# Altium PCB PCB1.PcbDoc (part 5 of 5)
Units mm, origin at the board's own origin, x right, y up, seen from the top; angles counter-clockwise.
Board outline 50 x 70 mm, 6 copper layers (Top Layer, L2, L3, L4, L5, Bottom Layer), stack 1.232 mm thick; 119 components, 75 nets, 612 pads, 243 vias.
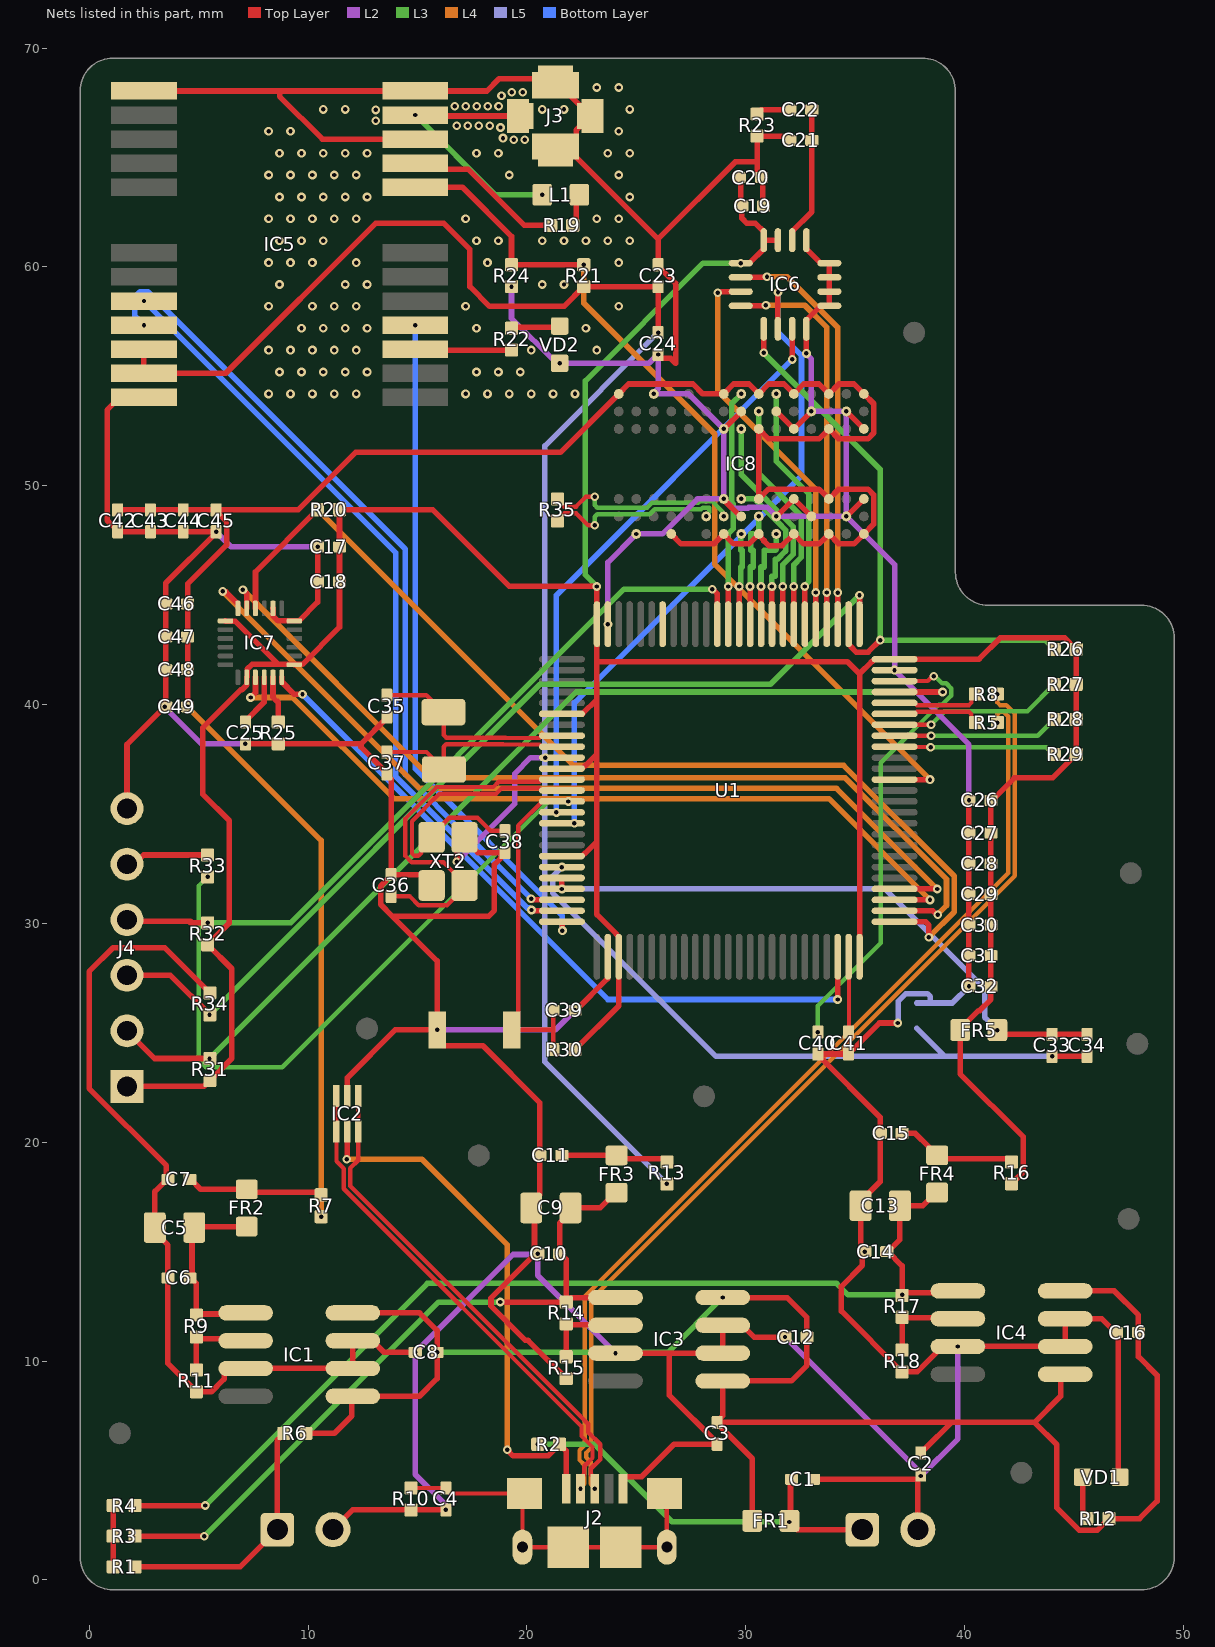
[diagram p6: the nets of this part, all layers, seen from the top]

## Part data (continued)
XT1: library part CRYSTAL_v2, "Crystal, 32.768Khz, 6Pf, 3.2Mm X 1.5Mm Rohs Compliant: Yes", Case/Package=SMD/SMT, ESR (Equivalent Series Resistance)="50 kOhm", Frequency=32.768kHz, Frequency Stability=-, Frequency Tolerance=±20ppm, Load Capacitance=6pF, Manufacturer="Abracon LLC", Manufacturer Part Number=ABS07-LR-32.768KHZ-6-T, Max Operating Temperature=85°C, Min Operating Temperature=-40°C, Operating Mode=Fundamental, Operating Temperature="-40°C ~ 85°C", Package / Case=2-SMD, Supplier Part Number=535-12942-1-ND, Tolerance=0.002%, Category="Crystals and Oscillators", China RoHS=Compliant, ComponentLink1Description=https://datasheet.octopart.com:443/ABS07-LR-32.768KHZ-6-T-Abracon-datasheet-182205061.pdf?src-supplier=Master+Electronics, ComponentLink1URL=https://datasheet.octopart.com:443/ABS07-LR-32.768KHZ-6-T-Abracon-datasheet-182205061.pdf?src-supplier=Master+Electronics, ComponentLink2Description=https://datasheet.octopart.com:443/ABS07-LR-32.768KHZ-6-T-Abracon-datasheet-65748761.pdf?src-supplier=element14+APAC, ComponentLink2URL=https://datasheet.octopart.com:443/ABS07-LR-32.768KHZ-6-T-Abracon-datasheet-65748761.pdf?src-supplier=element14+APAC, ComponentLink3Description=https://datasheet.octopart.com:443/ABS07-LR-32.768KHZ-6-T-Abracon-datasheet-103422647.pdf?src-supplier=Future+Electronics, ComponentLink3URL=https://datasheet.octopart.com:443/ABS07-LR-32.768KHZ-6-T-Abracon-datasheet-103422647.pdf?src-supplier=Future+Electronics, ComponentLink4Description=http://sigma.octopart.com:80/conflict_mineral_statement/Abracon-company-27.pdf?src-supplier=Compliance+Statements, ComponentLink4URL=http://sigma.octopart.com:80/conflict_mineral_statement/Abracon-company-27.pdf?src-supplier=Compliance+Statements, ESR=50kΩ, Harmonized Tariff Schedule (HTS) Code=8541.60.00.10, Height="0.035\" (0.90mm)", Introduction Date=2015-04-02, Length=3.2004mm, Lifecycle Status=Production, Manufacturer Part Number 1=ABS07-LR-32.768KHZ-6-T, Mounting Technology="Surface Mount", Mounting Type="Surface Mount", Packaging="Cut Tape (CT)", Pricing="1=1.5, 10=1.303, 25=1.232, 50=1.1812, 100=1.1322, 250=1.07076, 500=1.02648, 1000=0.98405 (USD)", Ratings=-, REACH SVHC=Yes, RoHS="RoHS Compliant", Schedule B="8541600025, 8541600025|8541600025|8541600025|8541600025|8541600025, 8541600080", Size / Dimension="0.126\" L x 0.061\" W (3.20mm x 1.50mm)", Stock=176427, Supplier=DigiKey, Supplier 1=Digi-Key, Supplier Part Number 1=535-12942-1-ND, Type="kHz Crystal (Tuning Fork)", Width=1.5494mm
XT2: library part CRYSTAL_19M2, "Seam Seal Crystal Ceramic, 8.000Mhz, 18Pf, 20Ppm-20+70C, 50Ppm-20+70C Rohs Compliant: Yes", Case/Package=CSMD, ESR (Equivalent Series Resistance)=200Ω, Frequency Stability=±10ppm, Load Capacitance=10pF, Manufacturer=Abracon, Manufacturer 1="TXC CORPORATION", Manufacturer Part Number=ABM3B-8.000MHZ-B2-T, Manufacturer Part Number 1=7M-27.120MEEQ-T, Max Operating Temperature=70°C, Max Supply Voltage=45V, Min Operating Temperature=-20°C, Min Supply Voltage=8.2V, Operating Mode=Fundamental, Operating Temperature="-20°C ~ 70°C", Output Current=1.8A, Output Voltage=3.3V, Package / Case="2.5mm pitch", Ratings="4.9152 MHz Crystal", Supplier Part Number 1=887-1329-1-ND, Tolerance=0.002%, Category=Crystals, China RoHS=Compliant, ComponentLink1Description=http://www.txccrystal.com/images/pdf/7m-accuracy.pdf, ComponentLink1URL=http://www.txccrystal.com/images/pdf/7m-accuracy.pdf, ComponentLink2Description=https://datasheet.octopart.com:443/ABM3B-8.000MHZ-B2-T-Abracon-datasheet-103053453.pdf?src-supplier=IHS, ComponentLink2URL=https://datasheet.octopart.com:443/ABM3B-8.000MHZ-B2-T-Abracon-datasheet-103053453.pdf?src-supplier=IHS, ComponentLink3Description=https://datasheet.octopart.com:443/ABM3B-8.000MHZ-B2-T-Abracon-datasheet-12510201.pdf?src-supplier=Farnell, ComponentLink3URL=https://datasheet.octopart.com:443/ABM3B-8.000MHZ-B2-T-Abracon-datasheet-12510201.pdf?src-supplier=Farnell, ComponentLink4Description=https://datasheet.octopart.com:443/ABM3B-8.000MHZ-B2-T-Abracon-datasheet-10078707.pdf?src-supplier=Farnell, ComponentLink4URL=https://datasheet.octopart.com:443/ABM3B-8.000MHZ-B2-T-Abracon-datasheet-10078707.pdf?src-supplier=Farnell, ComponentLink5Description=https://datasheet.octopart.com:443/ABM3B-8.000MHZ-B2-T-Abracon-datasheet-8877207.pdf?src-supplier=Farnell, ComponentLink5URL=https://datasheet.octopart.com:443/ABM3B-8.000MHZ-B2-T-Abracon-datasheet-8877207.pdf?src-supplier=Farnell, ComponentLink6Description=https://datasheet.octopart.com:443/ABM3B-8.000MHZ-B2-T-Abracon-datasheet-8791629.pdf?src-supplier=Farnell, ComponentLink6URL=https://datasheet.octopart.com:443/ABM3B-8.000MHZ-B2-T-Abracon-datasheet-8791629.pdf?src-supplier=Farnell, ComponentLink7Description=https://datasheet.octopart.com:443/ABM3B-8.000MHZ-B2-T-Abracon-datasheet-8450969.pdf?src-supplier=Farnell, ComponentLink7URL=https://datasheet.octopart.com:443/ABM3B-8.000MHZ-B2-T-Abracon-datasheet-8450969.pdf?src-supplier=Farnell, ComponentLink8Description=https://datasheet.octopart.com:443/ABM3B-8.000MHZ-B2-T-Abracon-datasheet-5300259.pdf?src-supplier=Farnell, ComponentLink8URL=https://datasheet.octopart.com:443/ABM3B-8.000MHZ-B2-T-Abracon-datasheet-5300259.pdf?src-supplier=Farnell, ComponentLink9Description=https://datasheet.octopart.com:443/ABM3B-8.000MHZ-B2-T-Abracon-datasheet-189095940.pdf?src-supplier=JRH+Electronics, ComponentLink9URL=https://datasheet.octopart.com:443/ABM3B-8.000MHZ-B2-T-Abracon-datasheet-189095940.pdf?src-supplier=JRH+Electronics, ComponentLink10Description=https://datasheet.octopart.com:443/ABM3B-8.000MHZ-B2-T-Abracon-datasheet-28516014.pdf?src-supplier=element14+APAC, ComponentLink10URL=https://datasheet.octopart.com:443/ABM3B-8.000MHZ-B2-T-Abracon-datasheet-28516014.pdf?src-supplier=element14+APAC, ComponentLink11Description=https://datasheet.octopart.com:443/ABM3B-8.000MHZ-B2-T-Abracon-datasheet-128558738.pdf?src-supplier=X-ON, ComponentLink11URL=https://datasheet.octopart.com:443/ABM3B-8.000MHZ-B2-T-Abracon-datasheet-128558738.pdf?src-supplier=X-ON, ComponentLink12Description=https://sigma.octopart.com:443/141159864/technical_drawing/Abracon-ABM3B-8.000MHZ-B2-T.pdf?src-supplier=Abracon+SCT, ComponentLink12URL=https://sigma.octopart.com:443/141159864/technical_drawing/Abracon-ABM3B-8.000MHZ-B2-T.pdf?src-supplier=Abracon+SCT, ComponentLink13Description=https://datasheet.octopart.com:443/ABM3B-8.000MHZ-B2-T-Abracon-datasheet-20679160.pdf?src-supplier=TME, ComponentLink13URL=https://datasheet.octopart.com:443/ABM3B-8.000MHZ-B2-T-Abracon-datasheet-20679160.pdf?src-supplier=TME, ComponentLink14Description=http://sigma.octopart.com:80/conflict_mineral_statement/Abracon-company-27.pdf?src-supplier=Compliance+Statements, ComponentLink14URL=http://sigma.octopart.com:80/conflict_mineral_statement/Abracon-company-27.pdf?src-supplier=Compliance+Statements, Composition=Ceramic, Depth=3.2mm, ESR=200Ω, Frequency=8MHz, Frequency Tolerance=±10ppm, Height=1.1mm, Lead Free="Lead Free", Length=5mm, Lifecycle Status=Production, Material=Ceramic, Mounting Technology="Surface Mount", Mounting Type="Surface Mount", Packaging=Rail/Tube, Pins=4, Pricing="1000=0.2318 (USD)", Radiation Hardening=No, REACH SVHC=Yes, RoHS=Compliant, Schedule B="8541600025, 8541600025|8541600025|8541600025|8541600025|8541600025|8541600025|8541600025|8541600025|8541600025|8541600025|8541600025|8541600025|8541600025|8541600025|8541600025|8541600025|8541600025|8541600025|8541600025|8541600025|8541600025|8541600025|8541600025|85", Size / Dimension="0.126\" L x 0.098\" W (3.20mm x 2.50mm)", Stock=70000, Supplier="Arrow Electronics", Supplier 1=Digi-Key, Supplier Part Number=ABM3B-8.000MHZ-B2-T, Termination=SMD/SMT, Type="MHz Crystal", Weight=120.003531mg, Width=3.2mm

## Via types
v1: diameter 0.4, hole 0.2, Top Layer to Bottom Layer, 129 vias
v2: diameter 0.4, hole 0.2, Top Layer to L3, 51 vias
v3: diameter 0.4, hole 0.2, Top Layer to L2, 31 vias
v4: diameter 0.4, hole 0.2, Top Layer to L4, 24 vias
v5: diameter 0.4, hole 0.2, Top Layer to L5, 8 vias

## Nets (pads, with @x,y where several pads share a name; then routed paths per layer and width w, separated by ;. In a path a pad name is that pad's centre, name@x,y a point inside that pad or via, vN(x,y) a via of type N, cw(c..) or ccw(c..) an arc to the next point about the centre after c; other vN are vias at no path point)
ACCEL1_CS: R28.1 U1.68 | length 7.6
  Top Layer w0.2: U1.68@36.804,38.577 38.473,38.577 v2(38.475,38.575)
  L3 w0.2: v2(38.475,38.575) 43.352,38.575 v2(44.104,39.328)
ACCEL2_CS: R27.1 U1.69 | length 8.1
  Top Layer w0.2: U1.69@36.804,39.077 38.473,39.077 v2(38.475,39.075)
  L3 w0.2: v2(38.475,39.075) 39.1,39.7 42.877,39.7 v2(44.104,40.928)
AVDD: C33.2 C34.2 FR5.1 U1.21 U1.22 | length 28
  Top Layer w0.254: v5(21.604,31.577) U1.21@21.604,32.077 ; v5(41.504,25.128) 41.704,24.928 C33.2@44.004,24.928 C34.2@45.604,24.928
  L5 w0.254: v5(21.604,31.577) 36.359,31.577 40.929,27.007 40.929,25.703 v5(41.504,25.128)
CPU_HSOSC_N: C38.1 U1.13 XT2.1 | length 14.4
  Top Layer w0.2: C38.1@19,34.235 18.345,34.235 17.745,34.835 16.45,34.835 15.65,34.035 XT2.1@15.65,33.935 15.181,33.466 15.181,33.237 15.033,33.088 14.867,33.088 14.75,33.206 14.75,34.671 16.014,35.935 18.6,35.935 18.842,36.177 20.577,36.177 20.677,36.077 U1.13@21.604,36.077
CPU_HSOSC_P: C36.1 U1.12 XT2.3 | length 16.9
  Top Layer w0.2: C36.1@13.8,31.235 14.655,31.235 15.055,30.835 16.35,30.835 17.15,31.635 17.15,31.835 16.196,32.788 14.743,32.788 14.45,33.081 14.45,34.796 15.889,36.235 18.476,36.235 18.718,36.477 20.577,36.477 20.677,36.577 U1.12@21.604,36.577
CPU_LSOSC_N: C37.2 U1.9 XT1.1 | length 9.6
  Top Layer w0.2: C37.2@13.5,37.835 C37.2@13.6,37.835 15.413,37.835 XT1.1@16.212,37.035 16.2,37.047 16.2,38.078 16.317,38.195 18.919,38.195 18.937,38.177 20.577,38.177 20.677,38.077 U1.9@21.604,38.077
CPU_LSOSC_P: C35.2 U1.8 XT1.2 | length 9.5
  Top Layer w0.2: C35.2@13.6,40.435 15.408,40.435 XT1.2@16.188,39.655 ; XT1.2@16.167,39.635 XT1.2@16.188,39.655 ; U1.8@21.604,38.577 20.677,38.577 20.577,38.477 19.061,38.477 19.043,38.495 16.317,38.495 16.2,38.612 16.2,39.642 XT1.2@16.188,39.655
DDR2_1_CLK_N: IC8.K8 R35.2 | length 8.3
  Top Layer w0.2: R35.2@21.4,48.4 21.6,48.6 21.6,48.633 21.717,48.75 22.25,48.75 22.8,48.2 v2(23.1,48.2)
  L3 w0.2: v2(23.1,48.2) 23.1,48.583 23.217,48.7 25.619,48.7 25.844,48.925 27.959,48.925 28.034,49 28.333,49 28.333,48.787 28.2,48.654 v2(28.2,48.6)
DDR2_1_CLK_P: IC8.J8 R35.1 | length 8.9
  Top Layer w0.2: R35.1@21.4,49.4 21.6,49.2 21.6,49.167 21.717,49.05 22.25,49.05 22.7,49.5 v2(23.1,49.5)
  L3 w0.2: v2(23.1,49.5) 23.1,49.117 23.217,49 25.495,49 25.72,49.225 27.835,49.225 27.91,49.3 28.457,49.3 28.962,48.795 28.962,48.638 v2(29,48.6)
DDR2_2_DQ0: IC8.G8 U1.86 | length 5.6
  Top Layer w0.254: U1.86@30.204,43.677 v2@30.204,45.396
  L3 w0.254: v2(30.2,45.4) 30.2,46.289 30.346,46.289 30.346,47.051 30.227,47.051 30.227,47.813 30.6,47.813 v2(30.6,48.6)
DDR2_2_DQ1: IC8.G2 U1.82 | length 10.7
  Top Layer w0.254: v2(32.2,45.4) v2(32.2,45.4) 32.202,43.679 U1.82@32.204,43.677
  L3 w0.254: v2(30.6,53.4) 30.6,50.567 32.535,48.632 32.535,46.728 32.2,46.393 v2(32.2,45.4)
DDR2_2_DQ2: IC8.H7 U1.84 | length 7.3
  Top Layer w0.254: v2(31.2,45.4) 31.202,45.398 31.202,43.679 U1.84@31.204,43.677
  L3 w0.254: v2(29.8,49.4) 30.404,49.4 31.515,48.288 31.827,47.977 31.827,47.022 31.443,46.637 31.346,46.637 31.346,45.875 31.2,45.875 v2(31.2,45.4)
DDR2_2_DQ3: IC8.H3 U1.83 | length 10.1
  Top Layer w0.254: v2(31.7,45.4) v2(31.7,45.4) 31.702,43.679 U1.83@31.704,43.677
  L3 w0.254: v2(29.8,52.6) 29.8,50.505 32.181,48.124 32.181,46.875 31.7,46.394 v2(31.7,45.4)
DDR2_2_DQ4: IC8.H1 U1.88 | length 10.8
  Top Layer w0.254: v2(29.2,45.4) 29.204,45.396 U1.88@29.204,43.677
  L3 w0.254: v2(29.2,45.4) 29.2,47.804 29.427,48.031 29.427,49.169 29.373,49.223 29.373,53.773 v2(29.8,54.2)
DDR2_2_DQ5: IC8.H9 U1.87 | length 4.3
  Top Layer w0.254: v2(29.7,45.4) 29.704,45.396 U1.87@29.704,43.677
  L3 w0.254: v2(29.7,45.4) 29.7,45.44 29.773,45.513 29.773,46.289 29.846,46.289 29.846,47.051 29.773,47.051 29.773,47.773 v2(29.8,47.8)
DDR2_2_DQ6: IC8.F1 U1.81 | length 11.2
  Top Layer w0.254: v2(32.7,45.4) 32.704,45.396 U1.81@32.704,43.677
  L3 w0.254: v2(31.4,54.2) 31.4,51.116 32.889,49.627 32.889,45.629 32.7,45.44 v2(32.7,45.4)
DDR2_2_DQ7: IC8.F9 U1.85 | length 4.8
  Top Layer w0.254: v2(30.7,45.4) 30.702,45.398 30.702,43.679 U1.85@30.704,43.677
  L3 w0.254: v2(30.7,45.4) 30.7,46.289 30.846,46.289 30.846,47.051 31.356,47.051 31.4,47.095 v2(31.4,47.8)
EXTINT: IC5.4 U1.25 | length 30.9
  Top Layer w0.254: U1.25@21.604,30.077 21.625,30.056 v1(21.625,29.675)
  Bottom Layer w0.254: v1(14.904,57.342) 14.904,37.071 21.625,30.35 v1(21.625,29.675)
GND: BATT1.2 C1.1 C2.1 C3.1 C4.1 C5.1 C6.1 C7.2 C8.1 C9.1 C10.1 C11.1 C12.1 C13.1 C14.1 C15.1 C16.1 C17.1 C18.1 C19.1 C20.1 C21.1 C23.1 C24.1 C25.1 C26.1 C27.1 C28.1 C29.1 C30.1 C31.1 C32.1 C35.1 C36.2 C37.1 C38.2 C39.1 C40.1 C41.1 C42.1 C43.1 C44.1 C45.1 C46.1 C47.1 C48.1 C49.1 IC1.3 IC1.6 IC1.7 IC2.2 IC3.3 IC3.6 IC3.7 IC4.3 IC4.6 IC4.7 IC5.10 IC5.12 IC5.13 IC5.24 IC6.8 IC6.9 IC6.10 IC6.11 IC6.12 IC6.13 IC7.18 IC7.20 IC8.A3 IC8.A7 IC8.B2 IC8.B8 IC8.D2 IC8.D8 IC8.E3 IC8.E7 IC8.F2 IC8.F8 IC8.H2 IC8.H8 IC8.J3 IC8.J7 IC8.N1 IC8.P9 J1.2 J2.5 J3.2 J4.6 NT1.2 R10.1 R11.1 R15.1 R18.1 R23.2 R24.1 R25.1 R34.1 SB1.1 U1.10 U1.27 U1.74 U1.99 VD1.K VD2.K XT2.2 XT2.4 | length 411.9
  Top Layer w0.254: J4.6@1.729,35.251 1.729,38.179 v3(3.45,39.9) ; IC5.24@2.504,54.042 1.404,54.042 0.823,53.461 0.823,48.427 1.3,47.95 C42.1@1.3,47.9 C43.1@2.8,47.9 C44.1@4.3,47.9 v3(5.8,47.9) 5.8,47.85 3.5,45.55 C46.1@3.5,44.6 C47.1@3.5,43.1 C48.1@3.5,41.6 C49.1@3.5,39.9 ; IC5.13@2.504,68.042 8.704,68.042 ; R34.1@5.515,26.829 3.444,28.9 1.1,28.9 0,27.8 0,22.459 3.528,18.931 3.528,18.372 C7.2@3.6,18.3 3.55,18.3 3,17.75 C5.1@3,16.1 3,15.9 3.6,15.3 C6.1@3.6,13.8 3.6,9.9 R11.1@4.9,8.6 5.581,8.6 6.165,9.184 6.165,9.459 6.371,9.665 IC1.3@7.15,9.665 IC1.6@12.05,9.665 IC1.7@12.05,10.935 12.95,10.935 13.485,10.4 v3(14.9,10.4) ; v3(7.14,38.208) R25.1@8.64,38.208 12.423,38.208 ; IC7.20@8.4,44.4 8.417,44.383 8.417,44.034 8.628,43.823 IC7.18@9.375,43.825 IC7.18@9.375,43.825 9.581,43.825 10.44,44.684 C18.1@10.44,45.608 10.44,47.14 C17.1@10.5,47.2 ; BATT1.2@11.14,2.3 12.04,3.2 R10.1@14.7,3.2 v3(16.3,3.2) ; IC2.2@11.8,22.113 11.8,22.95 13.985,25.135 v3(15.9,25.135) ; C35.1@13.6,39.435 13.6,39.385 12.423,38.208 ; IC5.10@14.904,65.842 10.658,65.842 8.704,67.796 8.704,68.042 ; XT2.2@15.65,31.735 15.65,31.764 15.179,32.235 C36.2@13.8,32.235 ; v3(16.8,32.825) 16.814,32.839 16.814,33.511 XT2.4@17.15,33.847 ; XT2.4@17.15,33.935 XT2.4@17.15,33.847 ; J3.2@21.3,65.5 J3.2@21.775,65.5 ; J3.2@21.3,68.6 18.731,68.6 18.173,68.042 IC5.12@14.904,68.042 8.704,68.042 ; R15.1@21.8,9.2 20.052,10.948 19.937,10.948 18.362,12.523 18.362,12.877 20.263,14.777 20.377,14.777 v3(20.5,14.9) 20.473,14.9 20.35,15.023 20.35,16.85 C9.1@20.2,17 20.2,17.2 20.6,17.6 C11.1@20.6,19.4 20.6,21.8 17.988,24.412 16.173,24.412 15.9,24.685 v3(15.9,25.135) ; J3.2@21.973,68.127 21.973,67.827 J3.2@22.9,66.9 22.248,66.248 22.248,65.973 J3.2@21.775,65.5 ; C39.1@22.25,26.035 23.695,27.48 23.695,28.468 U1.27@23.704,28.477 ; v3(24.05,10.365) 26.5,10.365 ; J2.5@24.4,4.175 24.4,4.65 24.473,4.723 25.252,4.723 26.729,6.2 C3.1@28.7,6.2 28.7,6.25 26.5,8.45 26.5,10.365 ; C24.1@26,55.95 26.123,55.827 26.573,55.827 26.8,55.6 26.8,59.25 26,60.05 C23.1@26,60.1 26,61.275 ; v3(29,49.4) 29,49.362 29.762,48.6 IC8.H8@29.8,48.6 ; v3(29,52.6) IC8.H2@29.8,53.4 ; C19.1@30.821,62.783 30.771,62.833 30.771,64.033 C20.1@30.721,64.083 30.671,64.083 30.521,64.233 30.521,64.8 ; v3(31.4,48.6) IC8.E7@32.2,49.4 IC8.D8@33,48.6 ; IC8.F2@31.4,53.4 IC8.E3@32.2,52.6 v3(33,53.4) ; v3(31.8,11.1) 30.385,11.1 29.85,11.635 IC3.7@28.95,11.635 IC3.6@28.95,10.365 26.5,10.365 ; C21.1@32.021,65.783 31.971,65.783 31.771,65.983 R23.2@30.521,65.983 30.521,64.8 ; v3(32.775,56.05) IC6.8@32.775,57.175 32.775,57.575 33.425,58.225 IC6.9@33.825,58.225 IC6.10@33.825,58.875 IC6.11@33.825,59.525 IC6.12@33.825,60.175 33.425,60.175 32.775,60.825 IC6.13@32.775,61.225 ; C1.1@33.1,4.6 37.85,4.6 37.87,4.62 J1.2@37.87,2.3 ; v3(34.6,48.6) IC8.A7@35.4,49.4 ; v3(34.6,53.4) IC8.A3@35.4,52.6 ; v5(36.95,25.45) 36.115,25.45 34.873,24.208 34.823,24.208 34.7,24.085 C41.1@34.7,24.035 33.35,24.035 33.3,23.985 36.15,21.135 C15.1@36.15,20.405 36.15,18.205 35.25,17.305 C13.1@35.25,17.105 35.25,15.155 35.4,15.005 v3(35.45,15.005) 35.329,14.884 35.329,14.374 34.373,13.418 34.373,12.282 R18.1@37.15,9.505 37.831,9.505 38.715,10.389 38.715,10.464 38.921,10.67 IC4.3@39.31,10.67 ; v3(39.7,10.67) IC4.6@44.6,10.67 IC4.7@44.6,11.94 46.265,11.94 46.9,11.305 C16.1@46.95,11.305 47.025,11.23 47.025,4.775 VD1.K@47.1,4.7 ; v5(40.204,27.128) C31.1@40.204,28.528 C30.1@40.204,29.928 C29.1@40.204,31.328 C28.1@40.204,32.728 C27.1@40.204,34.128 v3(40.204,35.628) ; 12.423,38.208 12.423,38.062 13.6,36.885 C37.1@13.6,36.835 13.6,36.785 13.8,36.585 C36.2@13.8,32.235 ; C36.2@13.8,32.235 13.8,32.185 13.323,31.708 13.323,30.87 13.866,30.327 ; 13.866,30.327 18.251,30.327 18.518,30.594 18.518,32.703 19,33.185 C38.2@19,33.235 17.762,33.235 XT2.4@17.15,33.847 ; 13.866,30.327 15.9,28.293 v3(15.9,25.135) ; J3.2@21.775,65.5 26,61.275 ; 26,61.275 29.525,64.8 30.521,64.8
  L2 w0.254: v3(3.45,39.9) 5.142,38.208 v3(7.14,38.208) ; v3(5.8,47.9) 6.492,47.208 v3(10.44,47.208) ; v3(15.9,25.135) 21.3,25.135 v3(22.2,26.035) ; v3(16.3,3.2) 16.275,3.225 16.275,3.45 14.9,4.825 v3(14.9,10.4) 19.372,14.872 20.472,14.872 v3(20.5,14.9) 20.5,13.915 v3(24.05,10.365) ; v3(16.8,32.825) 19.45,35.475 19.45,36.85 20.175,37.575 v3(20.85,37.575) ; v3(19.3,59.1) 19.3,57.65 21.325,55.625 21.475,55.625 v3(21.5,55.6) 25.578,55.6 25.978,56 v3(26,56) 26,54.439 25.8,54.24 v3(25.8,54.2) 27.4,54.2 v3(29,52.6) v3(29,49.4) ; v3(23.704,43.677) 23.704,46.504 v3(25,47.8) 26.2,47.8 27.8,49.4 v3(29,49.4) ; v3(31.8,11.1) 37.972,4.928 37.972,4.778 v3(38,4.75) 39.7,6.45 v3(39.7,10.67) ; v3(32.775,56.05) 32.775,56.01 33,55.785 v3(33,53.4) v3(34.6,53.4) v3(34.6,48.6) ; v3(40.204,35.628) 40.204,38.177 v3(36.804,41.577) 36.804,46.396 v3(34.6,48.6) ; v3(29,49.4) 29.427,48.973 30.095,48.973 30.149,49.027 30.973,49.027 v3(31.4,48.6) v3(34.6,48.6)
  L5 w0.254: v5(36.95,25.45) 36.978,25.478 36.978,26.45 37.319,26.791 38.307,26.791 38.44,26.658 38.44,26.364 ; NT1.2@37.813,26.364 38.44,26.364 ; v5(40.204,27.128) 39.441,26.364 38.44,26.364
  other v1: 8.2,54.2 9.2,54.2 10.2,54.2 11.2,54.2 12.2,54.2 17.2,54.2 18.2,54.2 19.2,54.2 20.2,54.2 21.2,54.2 22.2,54.2 8.7,55.2 9.7,55.2 10.7,55.2 11.7,55.2 12.7,55.2 17.7,55.2 18.7,55.2 19.7,55.2 8.2,56.2 9.2,56.2 10.2,56.2 11.2,56.2 12.2,56.2 20.2,56.2 23.2,56.2 9.7,57.2 10.7,57.2 11.7,57.2 12.7,57.2 17.7,57.2 22.7,57.2 8.2,58.2 10.2,58.2 11.2,58.2 12.2,58.2 17.2,58.2 24.2,58.2 8.7,59.2 11.7,59.2 12.7,59.2 20.7,59.2 21.7,59.2 8.2,60.2 9.2,60.2 10.2,60.2 12.2,60.2 18.2,60.2 24.2,60.2 8.7,61.2 9.7,61.2 10.7,61.2 17.7,61.2 18.7,61.2 20.7,61.2 21.7,61.2 22.7,61.2 23.7,61.2 24.7,61.2 8.2,62.2 9.2,62.2 10.2,62.2 11.2,62.2 12.2,62.2 17.2,62.2 23.2,62.2 24.2,62.2 8.7,63.2 9.7,63.2 10.7,63.2 11.7,63.2 12.7,63.2 24.7,63.2 8.2,64.2 9.2,64.2 10.2,64.2 11.2,64.2 12.2,64.2 19.2,64.2 24.2,64.2 8.7,65.2 9.7,65.2 10.7,65.2 11.7,65.2 12.7,65.2 17.7,65.2 18.7,65.2 23.7,65.2 24.7,65.2 19.407,65.819 19.907,65.819 18.912,65.89 8.2,66.2 9.2,66.2 24.2,66.2 18.794,66.376 16.801,66.457 17.301,66.457 17.801,66.457 18.301,66.457 13.098,66.677 13.098,67.177 10.7,67.2 11.7,67.2 20.7,67.2 21.7,67.2 24.7,67.2 16.709,67.345 17.209,67.343 17.709,67.343 18.209,67.343 18.709,67.343 18.84,67.826 19.315,67.981 19.815,67.981 23.2,68.2 24.2,68.2
GNDA: C33.1 C34.1 NT1.1 U1.20 | length 30.7
  Top Layer w0.254: v5(44.004,23.928) C34.1@45.604,23.928
  L5 w0.254: v5(21.604,32.577) 21.177,32.15 21.177,31.4 28.65,23.928 39.099,23.928 ; NT1.1@37.813,25.214 39.099,23.928 ; v5(44.004,23.928) 39.099,23.928
GYRO_CS: IC6.5 R26.1 U1.77 | length 27.3
  Top Layer w0.254: v2(30.825,56.075) IC6.5@30.825,57.175 ; U1.77@34.704,43.677 34.704,42.765 34.827,42.642 34.827,42.621 35.048,42.4 35.6,42.4 v2(36.15,42.95)
  L3 w0.254: v2(30.825,56.075) 36.15,50.75 v2(36.15,42.95) 43.682,42.95 v2(44.104,42.528)
GYRO_INT1: IC6.7 U1.15 | length 26.6
  Top Layer w0.254: v1(32.125,55.775) IC6.7@32.125,57.175
  Bottom Layer w0.254: v1(21.35,35.075) 21.35,45 v1(32.125,55.775)
GYRO_INT2: IC6.6 U1.16 | length 30.7
  Top Layer w0.254: IC6.6@31.475,57.175 v1(31.475,58.85)
  Bottom Layer w0.254: v1(22.175,34.575) 22.175,40.082 32.552,50.459 32.552,55.952 31.475,57.029 v1(31.475,58.85)
GYRO_SPI_MISO: IC6.4 U1.79 | length 17.9
  Top Layer w0.254: IC6.4@29.775,58.225 29.784,58.234 30.909,58.234 v4(30.925,58.25) ; v4(33.7,45.125) 33.704,45.121 U1.79@33.704,43.677
  L4 w0.254: v4(30.925,58.25) 32.7,58.25 33.7,57.25 v4(33.7,45.125)
GYRO_SPI_MOSI: IC6.3 U1.80 | length 18.1
  Top Layer w0.254: v4(28.725,58.825) 28.765,58.825 28.815,58.875 IC6.3@29.775,58.875 ; v4(33.2,45.125) 33.2,43.681 U1.80@33.204,43.677
  L4 w0.254: v4(28.725,58.825) 28.725,54.332 33.2,49.857 v4(33.2,45.125)
GYRO_SPI_SPC: IC6.2 U1.78 | length 19
  Top Layer w0.254: IC6.2@29.775,59.525 29.784,59.534 30.959,59.534 v4(30.975,59.55) ; U1.78@34.204,43.677 v4(34.204,45.121)
  L4 w0.254: v4(30.975,59.55) 31.901,59.55 34.204,57.247 v4(34.204,45.121)
MCU_BOOT0: U1.94
MCU_RST: C39.2 R30.1 R33.1 SB1.2 U1.14 | length 46.2
  Top Layer w0.2: R30.1@21.2,24.235 21.2,25.135 ; C39.2@21.2,26.035 21.2,25.135 ; U1.14@21.604,35.577 20.704,35.577 19.6,34.473 19.6,25.435 SB1.2@19.3,25.135 21.2,25.135
  L3 w0.2: v2(5.415,32.129) 5.015,31.729 5.015,23.745 5.334,23.425 8.825,23.425 21,35.6 21.875,35.6 v2(21.9,35.575)
MPU_CS: IC7.22 R20.1 U1.51 | length 47.2
  Top Layer w0.254: IC7.22@7.6,44.4 7.6,46.068 v4(10.44,48.908) ; U1.51@36.804,30.077 38.226,30.077 38.375,29.928 v4(38.375,29.375)
  L4 w0.254: v4(10.44,48.908) 22.123,37.225 34.476,37.225 39.531,32.17 39.531,31.898 39.531,30.531 v4(38.375,29.375)
MPU_FSYNC: IC7.11 R25.2 | length 2.1
  Top Layer w0.254: IC7.11@8.4,41.25 8.4,40.333 8.64,40.092 R25.2@8.64,39.208
MPU_INT: IC7.12 U1.48 | length 33.6
  Top Layer w0.254: IC7.12@8.8,41.25 8.8,41.044 9.369,40.475 v1(9.75,40.475) ; v1(34.2,26.525) 34.204,26.529 U1.48@34.204,28.477
  Bottom Layer w0.254: v1(9.75,40.475) 23.7,26.525 v1(34.2,26.525)
MPU_MISO: IC7.9 U1.53 | length 37.5
  Top Layer w0.254: v4(7.375,40.325) 7.6,40.55 IC7.9@7.6,41.25 ; U1.53@36.804,31.077 v4(38.423,31.077)
  L4 w0.254: v4(7.375,40.325) 9.296,40.325 13.92,35.701 33.799,35.701 v4(38.423,31.077)
MPU_MOSI: IC7.24 U1.54 | length 41.1
  Top Layer w0.254: v4(6.1,45.175) 6.128,45.147 6.259,45.147 IC7.24@6.783,44.623 ; U1.54@36.804,31.577 38.748,31.577 v4(38.75,31.575)
  L4 w0.254: v4(6.1,45.175) 15.1,36.175 34.15,36.175 v4(38.75,31.575)
MPU_REG: C25.2 IC7.10 | length 2.4
  Top Layer w0.254: C25.2@7.14,39.208 7.14,39.258 8,40.118 IC7.10@8,41.25
MPU_SPC: IC7.23 U1.52 | length 42.4
  Top Layer w0.254: v4(7.025,45.25) 7.2,45.075 IC7.23@7.2,44.4 ; U1.52@36.804,30.577 38.559,30.577 38.735,30.4 v4(38.775,30.4)
  L4 w0.254: v4(7.025,45.25) 15.625,36.65 34.55,36.65 39.177,32.023 39.177,30.82 38.775,30.418 v4(38.775,30.4)
NetC1_2: C1.2 FR1.1 J1.1 R2.2 | length 18.4
  Top Layer w0.254: v2(32,2.65) 32.22,2.43 32.35,2.3 J1.1@35.33,2.3 ; FR1.1@32,2.7 32.05,2.75 32.05,4.55 C1.2@32.1,4.6
  L3 w0.254: v2(20.5,6.2) 23.096,6.2 26.646,2.65 v2(32,2.65)
NetC4_2: C4.2 J2.6 R10.2 | length 16.9
  Top Layer w0.2: R10.2@14.7,4.2 C4.2@16.3,4.2 ; C4.2@16.3,4.15 16.5,3.95 J2.6@19.9,3.95 19.8,3.85 J2.6@19.8,1.5 J2.6@21.9,1.5 J2.6@24.3,1.5 J2.6@26.4,1.5 26.4,3.85 J2.6@26.3,3.95
NetC5_2: C5.2 C6.2 FR2.1 IC1.1 R9.2 | length 8.9
  Top Layer w0.254: C6.2@4.6,13.8 4.7,13.9 4.7,16 C5.2@4.8,16.1 4.85,16.15 FR2.1@7.2,16.15 ; C6.2@4.65,13.8 4.9,13.55 R9.2@4.9,12.1 4.952,12.153 7.098,12.153 IC1.1@7.15,12.205
NetC7_1: C7.1 FR2.2 R7.1 | length 6.3
  Top Layer w0.254: C7.1@4.6,18.3 4.65,18.3 5.1,17.85 FR2.2@7.2,17.85 7.325,17.725 10.475,17.725 R7.1@10.6,17.6
NetC9_2: C9.2 C10.2 FR3.1 IC3.1 R3.1 R14.2 | length 33.5
  Top Layer w0.254: R3.1@2.1,2 v2(5.262,2) ; v2(18.789,12.7) R14.2@21.8,12.7 ; C10.2@21.5,14.9 21.5,16.3 22,16.8 C9.2@22,17 23.35,17 24.05,17.7 FR3.1@24.1,17.7 ; C10.2@21.55,14.9 21.8,14.65 R14.2@21.8,12.7 ; IC3.1@24.05,12.905 22.005,12.905 R14.2@21.8,12.7
  L3 w0.254: v2(5.262,2) 15.962,12.7 v2(18.789,12.7)
NetC11_2: C11.2 FR3.2 R13.1 | length 4.9
  Top Layer w0.254: C11.2@21.6,19.4 FR3.2@24.1,19.4 24.25,19.25 26.25,19.25 R13.1@26.4,19.1
NetC13_2: C13.2 C14.2 FR4.1 IC4.1 R4.1 R17.2 | length 48.6
  Top Layer w0.254: R4.1@2.1,3.4 v2(5.306,3.4) ; C14.2@36.45,15.005 C14.2@36.5,15.005 ; v2(37.15,13.025) R17.2@37.15,13.005 37.27,13.125 39.615,13.125 IC4.1@39.7,13.21 ; R17.2@37.15,13.125 37.15,14.355 C14.2@36.5,15.005 ; FR4.1@38.75,17.705 38.7,17.705 38.1,17.105 C13.2@37.05,17.105 37.05,15.555 C14.2@36.5,15.005
  L3 w0.254: v2(5.306,3.4) 15.456,13.55 34.152,13.55 34.677,13.025 v2(37.15,13.025)
NetC15_2: C15.2 FR4.2 R16.1 | length 5.6
  Top Layer w0.254: C15.2@37.15,20.405 37.75,20.405 38.377,19.778 38.377,19.728 38.85,19.255 42,19.255 R16.1@42.15,19.105
NetC21_2: C21.2 C22.2 IC6.14 | length 6.3
  Top Layer w0.254: IC6.14@32.125,61.225 32.125,61.625 33.021,62.521 C21.2@33.021,65.783 C22.2@33.021,67.183
NetC22_1: C22.1 R23.1 | length 1.6
  Top Layer w0.254: R23.1@30.521,66.983 30.721,67.183 C22.1@32.021,67.183
NetC40_2: C40.2 U1.73 | length 21.2
  Top Layer w0.2: U1.73@36.804,41.077 38.323,41.077 38.546,41.3 v2(38.6,41.3)
  L3 w0.2: v2(33.3,25.035) 33.3,26.235 36.175,29.11 36.175,37.34 38.834,40 38.989,40 39.4,40.411 39.4,40.743 39.164,40.979 38.975,40.979 38.654,41.3 v2(38.6,41.3)
NetC41_2: C41.2 U1.49 | length 3.5
  Top Layer w0.2: U1.49@34.704,28.477 34.723,28.458 34.723,25.112 C41.2@34.8,25.035
NetIC1_2: IC1.2 R9.1 R11.2 | length 3.8
  Top Layer w0.254: R11.2@4.9,9.6 R9.1@4.9,11.1 4.982,11.017 7.067,11.017 IC1.2@7.15,10.935
NetIC2_5: IC2.5 J2.1 R2.1 | length 24.5
  Top Layer w0.254: v4(11.775,19.225) 11.788,19.238 11.788,20.475 IC2.5@11.8,20.488 ; v4(19.1,5.95) 19.377,5.673 20.973,5.673 R2.1@21.5,6.2 21.8,5.9 J2.1@21.8,4.175
  L4 w0.254: v4(11.775,19.225) 15.2,19.225 19.1,15.325 v4(19.1,5.95)
NetIC3_2: IC3.2 R14.1 R15.2 | length 3.7
  Top Layer w0.254: R15.2@21.8,10.2 21.8,11.635 21.833,11.667 24.018,11.667 IC3.2@24.05,11.635
NetIC4_2: IC4.2 R17.1 R18.2 | length 4
  Top Layer w0.254: R18.2@37.2,10.555 37.15,10.605 R17.1@37.15,12.005 37.182,11.972 39.668,11.972 IC4.2@39.7,11.94
NetIC5_9: IC5.9 R19.1 | length 7.4
  Top Layer w0.254: IC5.9@14.904,64.742 15.177,64.469 17.318,64.469 19.887,61.9 R19.1@21.1,61.9
NetIC5_11: IC5.11 J3.1 L1.2 | length 12
  Top Layer w0.254: v2(14.904,66.942) 14.946,66.9 J3.1@19.6,66.9
  L3 w0.254: v2(14.904,66.942) 18.546,63.3 v2(20.7,63.3)
NetJ4_5: J4.5 R33.2 | length 3.9
  Top Layer w0.254: J4.5@1.729,32.711 2.066,32.711 2.484,33.129 R33.2@5.415,33.129
NetL1_1: L1.1 R19.2 | length 1.5
  Top Layer w0.254: R19.2@22.1,61.9 22.25,62.05 22.25,63.15 L1.1@22.4,63.3
NetR1_2: R1.2 R3.2 R4.2 | length 2.8
  Top Layer w0.254: R1.2@1.1,0.6 R3.2@1.1,2 R4.2@1.1,3.4
NetR12_1: R12.1 VD1.A | length 2
  Top Layer w0.254: VD1.A@45.4,4.7 45.4,3 R12.1@45.6,2.8
NetR22_1: R22.1 VD2.A | length 2.2
  Top Layer w0.254: R22.1@19.3,57.2 19.35,57.25 21.45,57.25 VD2.A@21.5,57.3
PRESS_CS: R29.1 U1.67 | length 7.4
  Top Layer w0.2: U1.67@36.804,38.077 36.818,38.063 38.437,38.063 v2(38.45,38.05)
  L3 w0.2: v2(38.45,38.05) 43.728,38.05 44.05,37.728 v2(44.104,37.728)
PULSE: IC5.3 R22.2 | length 4.4
  Top Layer w0.254: IC5.3@14.904,56.242 14.946,56.2 R22.2@19.3,56.2
RESET_NEO8M8: IC5.8 R21.1 R24.2 U1.64 | length 41.6
  Top Layer w0.254: IC5.8@14.904,63.642 17.058,63.642 19.3,61.4 R24.2@19.3,60.1 v4(22.6,60.1) ; U1.64@36.804,36.577 36.806,36.575 v4(38.425,36.575)
  L4 w0.254: v4(22.6,60.1) 22.6,58.35 28.596,52.354 28.596,46.404 v4(38.425,36.575)
SWCLK: J4.3 R34.2 U1.76 | length 43.5
  Top Layer w0.254: J4.3@1.729,27.631 3.713,27.631 R34.2@5.515,25.829 ; v2(35.2,45) 35.204,44.996 U1.76@35.204,43.677
  L3 w0.254: v2(5.5,25.825) 20.606,40.931 31.131,40.931 v2(35.2,45)
SWDIO: J4.2 R31.1 U1.72 | length 46.9
  Top Layer w0.254: J4.2@1.729,25.091 2.991,23.829 R31.1@5.515,23.829 ; U1.72@36.804,40.577 v2(39,40.577)
  L3 w0.254: v2(5.5,23.825) 22.252,40.577 v2(39,40.577)
SWO: J4.4 R32.1 U1.89 | length 34.8
  Top Layer w0.254: J4.4@1.729,30.171 1.8,30.1 4.629,30.1 ; 4.629,30.029 v2(5.415,30.029) ; v2(28.475,45.275) 28.488,45.275 28.704,45.059 U1.89@28.704,43.677
  L3 w0.254: v2(5.415,30.029) 9.203,30.029 24.449,45.275 v2(28.475,45.275)
UART_RxD: IC5.20 U1.24 | length 36.6
  Top Layer w0.254: v1(20.214,30.614) 20.254,30.614 20.283,30.586 21.595,30.586 U1.24@21.604,30.577
  Bottom Layer w0.254: v1(2.504,58.442) 14,46.946 14,36.726 20.019,30.707 20.082,30.707 20.175,30.614 v1(20.214,30.614)
UART_TxD: IC5.21 U1.23 | length 38.6
  Top Layer w0.254: v1(20.195,31.134) 20.235,31.134 20.283,31.086 21.595,31.086 U1.23@21.604,31.077
  Bottom Layer w0.254: v1(2.504,57.342) 2.077,57.769 2.077,58.619 2.327,58.869 2.681,58.869 14.45,47.1 14.45,36.804 17.271,33.983 17.346,33.983 v1(20.195,31.134)
USB2_D1_N: IC2.3 IC2.4 J2.2 R5.1 | length 67.6
  Top Layer w0.2: IC2.3@11.3,22.113 11.3,19.134 11.635,18.799 11.635,17.878 22.5,7.013 22.5,6.576 23,6.076 23,5.576 22.625,5.201 22.625,4.825 22.45,4.65 v4(22.45,4.175)
  L4 w0.2: v4(22.45,4.175) 22.45,4.217 22.625,4.392 22.625,5.265 22.407,5.483 22.407,5.931 22.651,6.176 22.651,12.953 42.004,32.305 42.004,39.46 41.787,39.678 41.621,39.678 41.504,39.56 v4(41.504,39.178)
USB2_D1_P: IC2.1 IC2.6 J2.3 R8.1 | length 68.1
  Top Layer w0.2: IC2.1@12.3,22.113 12.3,19.184 11.935,18.82 11.935,18.002 22.8,7.138 22.8,6.75 23.35,6.2 23.35,5.502 22.925,5.077 22.925,4.825 23.1,4.65 v4(23.1,4.175)
  L4 w0.2: v4(23.1,4.175) 23.1,4.217 22.925,4.392 22.925,5.389 22.707,5.607 22.707,5.807 22.951,6.051 22.951,12.829 42.304,32.181 42.304,39.585 41.911,39.978 41.621,39.978 41.504,40.095 v4(41.504,40.478)
USB2_D2_N: R5.2 U1.70 | length 3.9
  Top Layer w0.2: U1.70@36.804,39.577 37.731,39.577 37.831,39.677 38.628,39.677 ; 38.629,39.678 40.204,39.678 40.321,39.56 40.321,39.36 R5.2@40.409,39.272
USB2_D2_P: R8.2 U1.71 | length 4.1
  Top Layer w0.2: U1.71@36.804,40.077 37.731,40.077 37.831,39.977 38.504,39.977 40.204,39.978 40.321,40.095 40.321,40.295 R8.2@40.504,40.478
VCC1P8_DDR2: C42.2 C43.2 C44.2 C45.2 C46.2 C47.2 C48.2 C49.2 IC8.A1 IC8.A9 IC8.C1 IC8.C3 IC8.C7 IC8.C9 IC8.E1 IC8.E9 IC8.G1 IC8.G3 IC8.G7 IC8.G9 IC8.J1 IC8.J9 IC8.M9 IC8.R1 R7.2 | length 103.7
  Top Layer w0.254: C42.2@1.3,48.9 C43.2@2.8,48.9 C44.2@4.3,48.9 C45.2@5.8,48.9 ; v4(4.5,39.9) C48.2@4.5,41.6 C47.2@4.5,43.1 C46.2@4.5,44.6 4.5,45.519 6.277,47.296 6.277,48.373 5.8,48.85 C45.2@5.8,48.9 ; IC8.M9@26.6,47.8 27.052,47.348 28.548,47.348 IC8.J9@29,47.8 29.452,47.348 30.148,47.348 IC8.G9@30.6,47.8 30.6,47.747 30.838,47.509 30.838,47.472 31.045,47.265 31.665,47.265 IC8.E9@32.2,47.8 32.652,47.348 33.348,47.348 IC8.C9@33.8,47.8 34.252,47.348 34.948,47.348 IC8.A9@35.4,47.8 35.852,48.252 35.852,49.587 35.587,49.852 34.252,49.852 IC8.C7@33.8,49.4 33.348,49.852 31.052,49.852 IC8.G7@30.6,49.4 IC8.G3@30.6,52.6 31.052,52.148 33.348,52.148 IC8.C3@33.8,52.6 34.252,52.148 35.587,52.148 35.852,52.413 35.852,53.748 IC8.A1@35.4,54.2 34.948,54.652 34.252,54.652 IC8.C1@33.8,54.2 33.348,54.652 32.652,54.652 IC8.E1@32.2,54.2 31.748,54.652 31.052,54.652 IC8.G1@30.6,54.2 30.148,54.652 29.452,54.652 IC8.J1@29,54.2 28.039,54.2 27.587,54.652 24.652,54.652 IC8.R1@24.2,54.2 21.531,51.531 12.177,51.531 9.546,48.9 C45.2@5.8,48.9
  L4 w0.254: v4(4.5,39.9) 10.6,33.8 v4(10.6,16.6)
VCC3P3_MCU: C17.2 C18.2 C19.2 C20.2 C26.2 C27.2 C28.2 C29.2 C30.2 C31.2 C32.2 FR5.2 IC6.1 IC6.15 IC6.16 IC7.1 IC7.8 IC7.13 J4.1 R16.2 R20.2 R26.2 R27.2 R28.2 R29.2 R30.2 R31.2 R32.2 U1.6 U1.11 U1.19 U1.28 U1.50 U1.75 U1.100 | length 169.6
  Top Layer w0.254: J4.1@1.729,22.551 5.237,22.551 R31.2@5.515,22.829 6.515,23.829 6.515,27.929 R32.2@5.415,29.029 6.4,30.014 6.4,34.7 5.2,35.9 5.2,38.95 6.923,40.673 6.972,40.673 7.2,40.901 IC7.8@7.2,41.25 7.217,41.267 7.217,41.616 7.443,41.842 8.644,41.842 ; IC7.1@6.225,43.825 6.242,43.808 6.678,43.808 8.644,41.842 ; U1.19@21.604,33.077 22.516,33.077 22.639,33.2 22.66,33.2 23.204,33.744 ; U1.11@21.604,37.077 22.516,37.077 22.639,37.2 22.66,37.2 23.204,37.744 ; U1.6@21.604,39.577 21.613,39.586 22.546,39.586 23.204,40.244 ; R30.2@22.2,24.235 24.204,26.239 U1.28@24.204,28.477 24.204,29.389 24.081,29.512 24.081,29.533 23.292,30.323 ; 23.204,30.41 23.204,33.744 ; C20.2@29.666,64.2 C20.2@29.716,64.15 ; C20.2@29.721,64.083 29.771,64.033 29.771,62.833 C19.2@29.821,62.783 29.821,62.229 30.057,61.993 30.445,61.993 30.825,61.613 IC6.16@30.825,61.225 ; IC6.1@30.175,60.175 30.825,60.825 IC6.16@30.825,61.225 ; IC6.15@31.475,61.225 IC6.16@30.825,61.225 ; U1.50@35.204,28.477 35.204,41.41 ; FR5.2@39.804,25.128 39.804,23.13 42.677,20.257 42.677,18.632 R16.2@42.15,18.105 ; FR5.2@39.804,25.178 40.641,26.014 40.691,26.014 41.204,26.528 C32.2@41.204,27.128 C31.2@41.204,28.528 C30.2@41.204,29.928 C29.2@41.204,31.328 C28.2@41.204,32.728 C27.2@41.204,34.128 C26.2@41.204,35.628 41.254,35.628 42.279,36.653 44.029,36.653 R29.2@45.104,37.728 R28.2@45.104,39.328 R27.2@45.104,40.928 R26.2@45.104,42.528 44.577,43.055 41.64,43.055 40.662,42.077 U1.75@36.804,42.077 35.892,42.077 35.769,41.954 35.748,41.954 35.204,41.41 ; 8.644,41.842 9.358,41.842 IC7.13@9.375,41.825 9.392,41.842 9.741,41.842 11.44,43.541 C18.2@11.44,45.608 C17.2@11.44,47.208 R20.2@11.44,48.908 15.692,48.908 19.2,45.4 v2(23.2,45.4) 23.204,45.396 U1.100@23.204,43.677 23.204,41.96 ; 23.204,33.744 23.204,37.744 ; 23.204,37.744 23.204,40.244 ; 23.204,40.244 23.204,41.96 ; 23.204,41.96 34.654,41.96 35.204,41.41
  L3 w0.254: v2(23.2,45.4) 22.673,45.927 22.673,54.798 28.05,60.175 v2(29.775,60.175)
VCC3P3_RF: C23.2 C24.2 IC5.22 IC5.23 R13.2 R21.2 | length 75.8
  Top Layer w0.254: IC5.22@2.504,56.242 IC5.23@2.504,55.142 6.242,55.142 13.1,62 16.2,62 17.4,60.8 17.4,59.1 18.3,58.2 21.7,58.2 R21.2@22.6,59.1 C23.2@26,59.1 v5(26,57)
  L5 w0.254: v5(26,57) 20.823,51.823 20.823,23.677 v5(26.4,18.1)
VCC3P7_BATT: BATT1.1 R1.1 R6.1 | length 11.7
  Top Layer w0.254: R1.1@2.1,0.6 6.9,0.6 BATT1.1@8.6,2.3 8.6,6.4 R6.1@8.9,6.7
VCC5P0_USB: C2.2 C3.2 C8.2 C12.2 C16.2 FR1.2 IC1.5 IC1.8 IC3.5 IC3.8 IC4.5 IC4.8 R6.2 R12.2 | length 87.7
  Top Layer w0.254: R6.2@9.9,6.7 11.2,6.7 12,7.5 12,8.345 IC1.5@12.05,8.395 15.095,8.395 15.9,9.2 v2(15.9,10.4) 15.9,11.4 15.095,12.205 IC1.8@12.05,12.205 ; C3.2@28.7,7.25 28.95,7.5 IC3.5@28.95,9.095 32.095,9.095 32.8,9.8 C12.2@32.8,11.1 32.8,12 31.895,12.905 v2(28.95,12.905) ; FR1.2@30.3,2.7 30.3,5.55 28.7,7.15 C3.2@28.7,7.2 39.4,7.2 ; C2.2@38,5.8 38,5.85 38.123,5.973 38.173,5.973 39.4,7.2 ; IC4.5@44.6,9.4 44.4,9.2 44.4,8.4 43.2,7.2 ; IC4.8@44.6,13.21 46.845,13.21 47.95,12.105 C16.2@47.95,11.305 ; C16.2@47.85,11.205 C16.2@47.95,11.305 ; 39.4,7.2 43.2,7.2 ; 43.2,7.2 44.221,6.179 44.221,3.294 45.241,2.273 46.073,2.273 R12.2@46.6,2.8 48,2.8 48.8,3.6 48.8,9.355 47.95,10.205 C16.2@47.95,11.305
  L3 w0.254: v2(15.9,10.4) 26.445,10.4 v2(28.95,12.905)
pads on no net: C1.0 C2.0 C3.0 C4.0 C5.0 C6.0 C7.0 C8.0 C9.0 C10.0 C11.0 C12.0 C13.0 C14.0 C15.0 C16.0 C17.0 C18.0 C19.0 C20.0 C21.0 C22.0 C23.0 C24.0 C25.0 C26.0 C27.0 C28.0 C29.0 C30.0 C31.0 C32.0 C33.0 C34.0 C35.0 C36.0 C37.0 C38.0 C39.0 C40.0 C41.0 C42.0 C43.0 C44.0 C45.0 C46.0 C47.0 C48.0 C49.0 F1.1 F2.1 F3.1 F4.1 F5.1 F6.1 F7.1 F8.1 F9.1 FR1.0 FR2.0 FR3.0 FR4.0 FR5.0 IC1.4 IC3.4 IC4.4 IC5.1 IC5.2 IC5.5 IC5.6 IC5.7 IC5.14 IC5.15 IC5.16 IC5.17 IC5.18 IC5.19 IC7.2 IC7.3 IC7.4 IC7.5 IC7.6 IC7.7 IC7.14 IC7.15 IC7.16 IC7.17 IC7.19 IC7.21 IC8.A2 IC8.A8 IC8.B1 IC8.B3 IC8.B7 IC8.B9 IC8.C2 IC8.C8 IC8.D1 IC8.D3 IC8.D7 IC8.D9 IC8.E2 IC8.E8 IC8.F3 IC8.F7 IC8.J2 IC8.K2 IC8.K3 IC8.K7 IC8.K9 IC8.L1 IC8.L2 IC8.L3 IC8.L7 IC8.L8 IC8.M2 IC8.M3 IC8.M7 IC8.M8 IC8.N2 IC8.N3 IC8.N7 IC8.N8 IC8.P2 IC8.P3 IC8.P7 IC8.P8 IC8.R2 IC8.R3 IC8.R7 IC8.R8 J2.4 L1.0 R1.0 R2.0 R3.0 R4.0 R5.0 R6.0 R7.0 R8.0 R9.0 R10.0 R11.0 R12.0 R13.0 R14.0 R15.0 R16.0 R17.0 R18.0 R19.0 R20.0 R21.0 R22.0 R23.0 R24.0 R25.0 R26.0 R27.0 R28.0 R29.0 R30.0 R31.0 R32.0 R33.0 R34.0 R35.0 U1.1 U1.2 U1.3 U1.4 U1.5 U1.7 U1.17 U1.18 U1.26 U1.29 U1.30 U1.31 U1.32 U1.33 U1.34 U1.35 U1.36 U1.37 U1.38 U1.39 U1.40 U1.41 U1.42 U1.43 U1.44 U1.45 U1.46 U1.47 U1.55 U1.56 U1.57 U1.58 U1.59 U1.60 U1.61 U1.62 U1.63 U1.65 U1.66 U1.90 U1.91 U1.92 U1.93 U1.95 U1.96 U1.97 U1.98 VD1.0 VD2.0 XT2.0

## Polygon pours and split planes (outlines as drawn)
GND on Top Layer "GND_L01_P006" (solid, pour order 6): 7.8,66.975 7.8,53.341 25.575,53.265 25.575,69.35 7.8,69.35 7.8,67.525
GND on Top Layer "Top Layer-GND" (solid, pour order 5): 20.297,68.151 20.464,68.039 20.576,67.872 20.615,67.675 20.615,66.125 20.576,65.928 20.464,65.761 20.297,65.649 20.1,65.61 19.1,65.61 18.903,65.649 18.736,65.761 18.624,65.928 18.585,66.125 18.585,66.248 16.815,66.248 16.768,66.178 16.601,66.066 16.404,66.027 13.404,66.027 13.207,66.066 13.04,66.178 12.928,66.345 12.889,66.542 12.889,67.342 12.928,67.539 13.04,67.706 13.207,67.818 13.404,67.857 16.404,67.857 16.601,67.818 16.768,67.706 16.871,67.552 18.585,67.552 18.585,67.675 18.624,67.872 18.736,68.039 18.903,68.151 19.1,68.19 20.1,68.19
GND on Bottom Layer "GND_L06_P011" (solid, pour order 11): 7.825,69.375 7.775,69.325 7.775,53.3 25.525,53.3 25.525,69.35

## Other copper
Top Layer:
  pour cut-out: 20.173,67.748 20.203,67.675 20.203,66.125 20.173,66.052 20.1,66.022 19.1,66.022 19.027,66.052 18.997,66.125 18.997,66.66 16.507,66.66 16.507,66.542 16.477,66.469 16.404,66.439 13.404,66.439 13.331,66.469 13.301,66.542 13.301,67.342 13.331,67.415 13.404,67.445 16.404,67.445 16.477,67.415 16.507,67.342 16.507,67.14 18.997,67.14 18.997,67.675 19.027,67.748 19.1,67.778 20.1,67.778

## Silkscreen, mask and mechanical layers (free items; w line width, h text height)
Top Overlay:
  the board outline again, w0.15
  text "GND" at 3.365,34.979 h0.55
  text "SWO" at 3.165,30.179 h0.55
  text "SWCLK" at 3.365,27.579 h0.55
  text "SWDIO" at 3.265,24.579 h0.55
  text "VCC" at 0.965,20.379 h0.55
  text "VCC" at 7.75,0.05 h0.55
  text "GND" at 10.55,0.05 h0.55
  text "VCC" at 34.55,-0.05 h0.55
  text "GND" at 37.25,-0.05 h0.55
Mechanical 1:
  text "NOTES:" at -25.65,44.45 h0.55
  text "STACKUP:" at -24.55,42.85 h0.55
  text "Top: RF/Signal/GND / L2: GND / L3: PWR/Signal/GND / L4: Signal/PWR/GND / L5: Signal/PWR/GND / Bottom: PWR/Signal/GND" at -24,34.7 h0.55
  text "DIF. PAIR WIDTH: 0.2mm / DIF. PAIR SPACING: 0.1mm / DIF. IMPEDANCE: 100.043 Ohms / TOLERANCE: +/- 10%" at -26.6,25.8 h0.55
  text "TOP-L2 -> 200 um / TOP LAYER COPPER FOIL THICKNESS: 36 um / Er(TOP-L2) = 3.48" at -26.4,18.5 h0.55

## Text inside footprints (layer, text, board x,y; h text height)
J3: Top ASM TOP/ASM BOT "in" at 20,66.2 h0.9 r90